# Altium PCB PCB1.PcbDoc (part 7 of 8)
Units mil, origin at the board's own origin, x right, y up, seen from the top; angles counter-clockwise.
Board outline 1968.5 x 1968.5 mil, 4 copper layers (Top Layer, Layer 1, Layer 2, Bottom Layer), stack 23.756 mil thick; 223 components, 143 nets, 652 pads, 329 vias.
Unrouted connection lines stored in the file: 15.
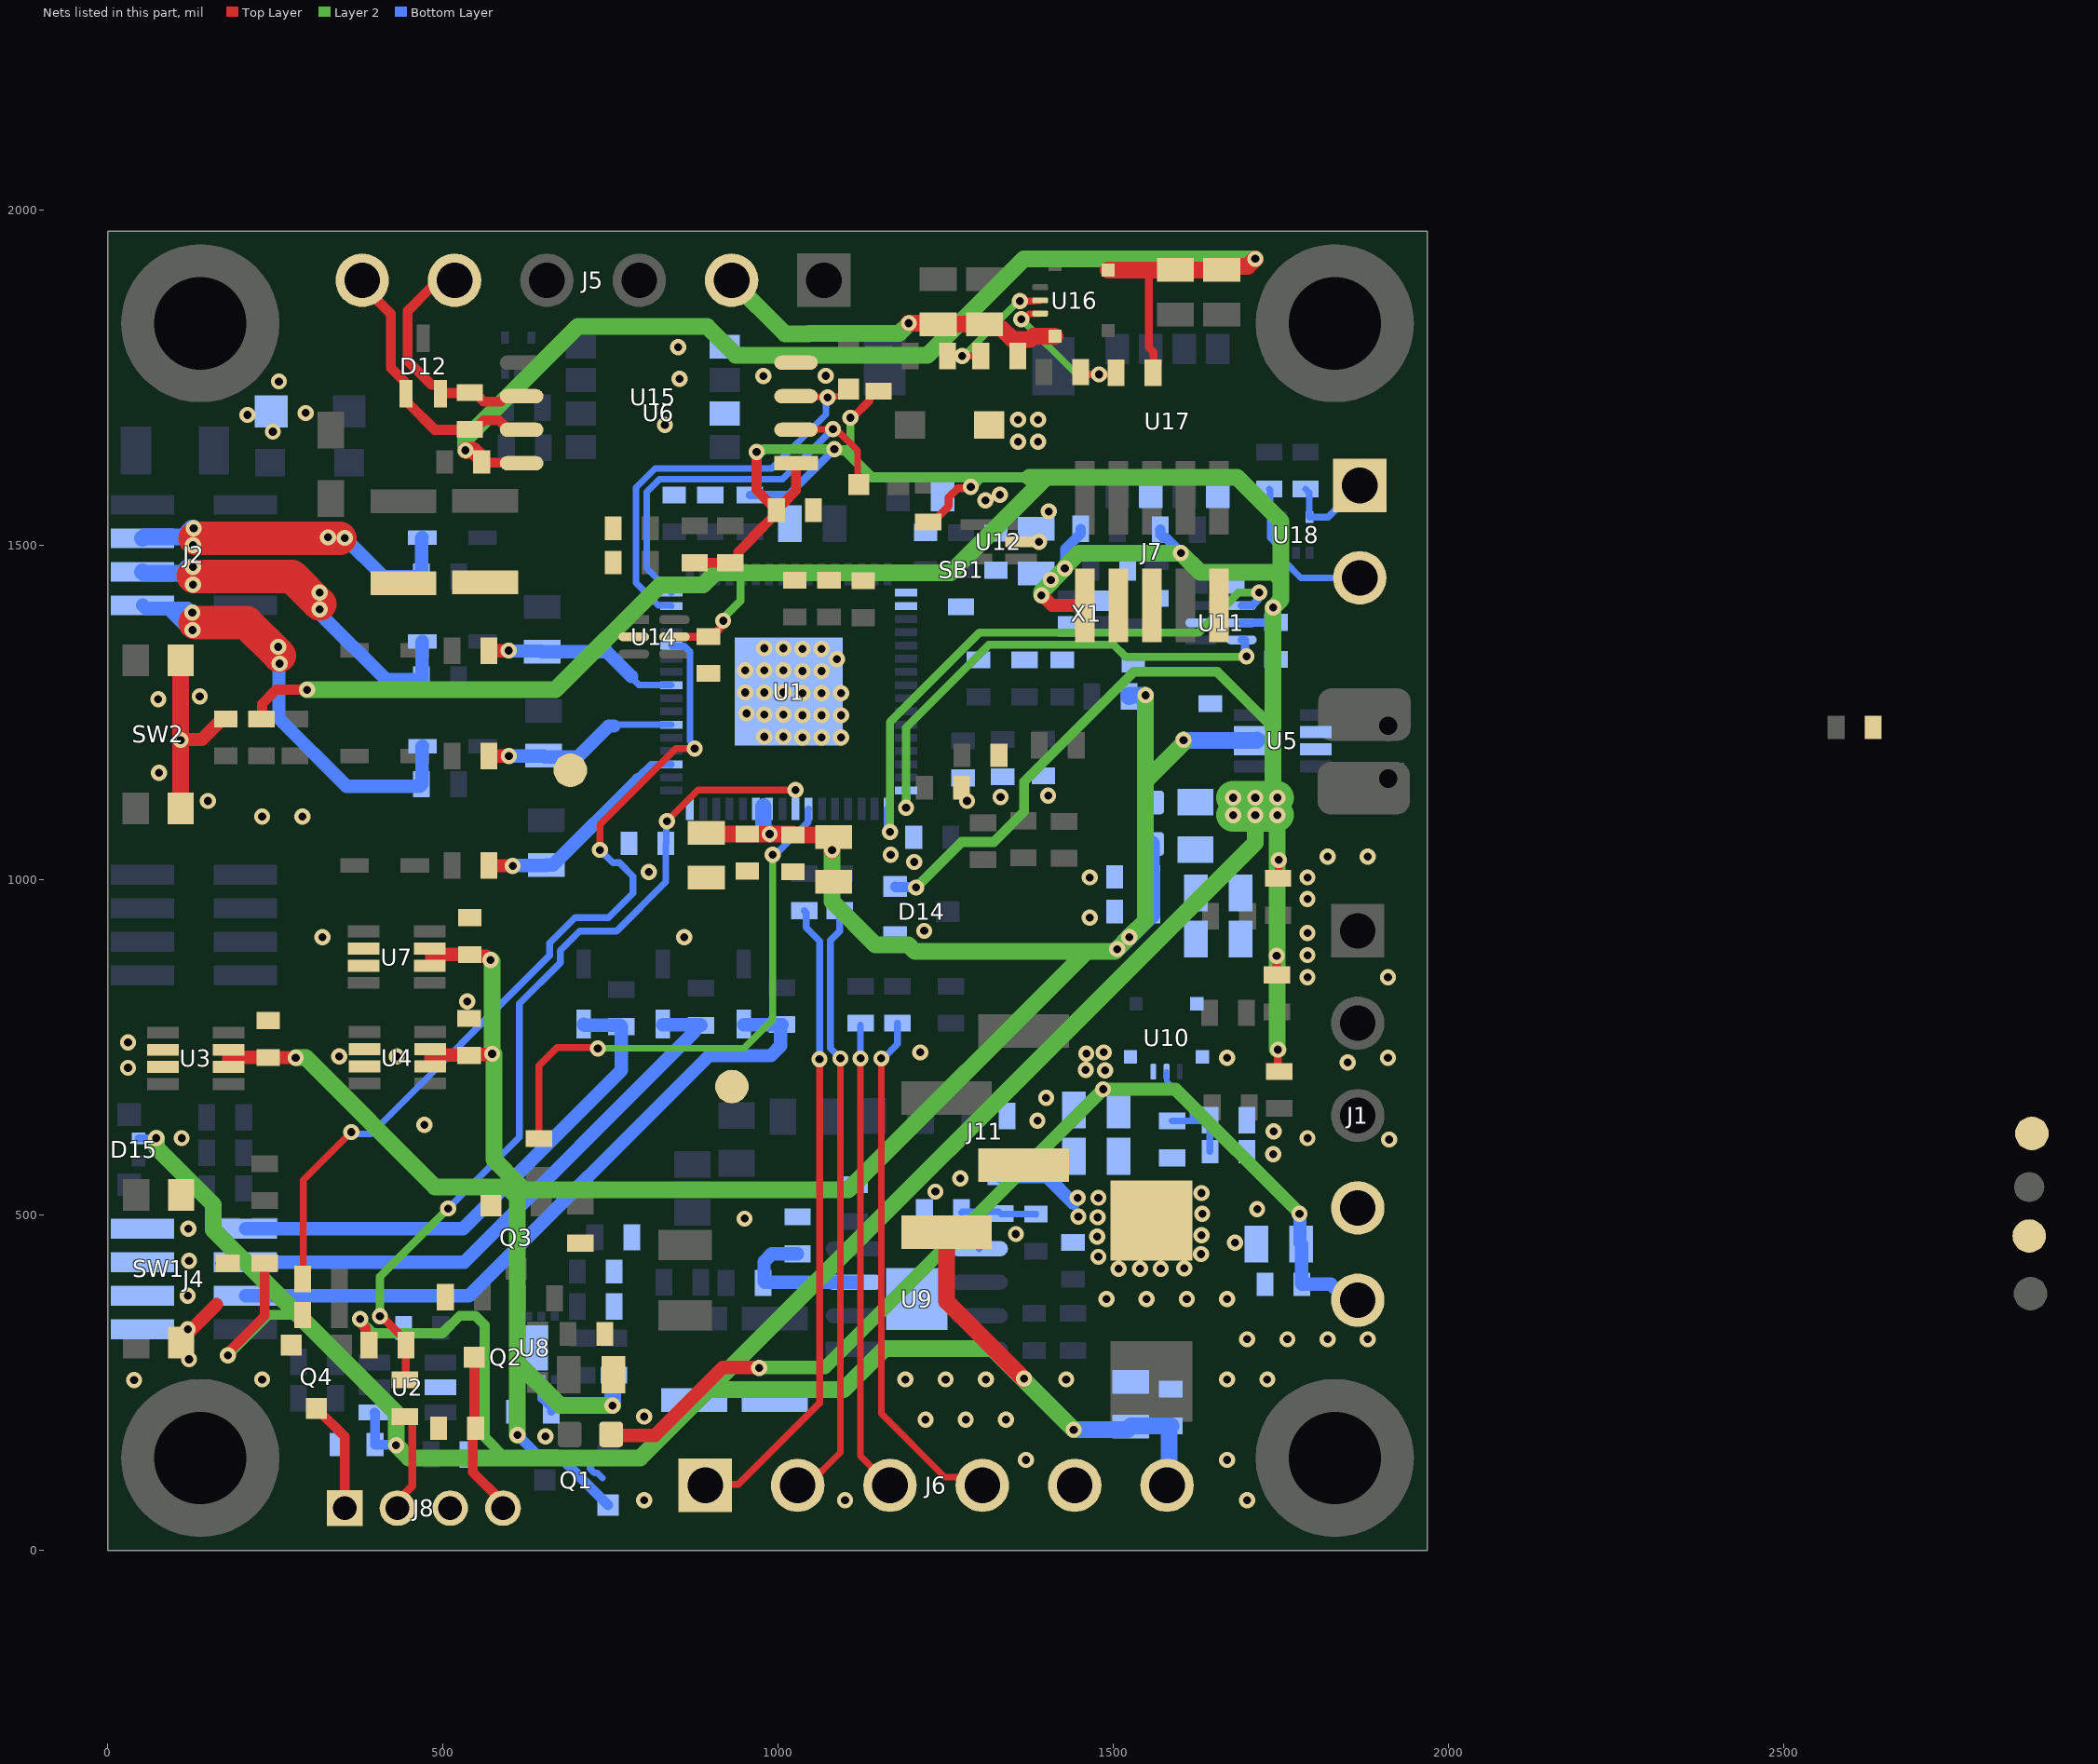
[diagram p4: the nets of this part, all layers, seen from the top]

## Part data (continued)
U10 U16: "3V to 17V input voltage, 3.3V, 3A output synchronous buck module in QFN package 7-QFN-FCMOD -40 to 125", Manufacturer="Texas Instruments", Manufacturer Lifecycle Status=ACTIVE, Package=None, Supplier Part Number=296-TPSM863253RDXRCT-ND, Category="Integrated Circuits (ICs)", Check_prices=https://www.snapeda.com/parts/TPSM863253RDXR/Texas+Instruments/view-part/?ref=eda, ComponentLink1Description=https://octopart.com:443/opatz8j6/c1?t=jS2VDNp59x-r3M4UnJwIkxDyXkbjHNSAoP2Fns5-Wk80kLlb-mQ5gVuk8zyi84j77RuBrZF-262aE3noOfDKcDGPEWkV9DoDQewFCLFFRyInceCxvVyAfhTYCYIywjkPWDqBy3YcbHQILjtWA_Eaj3WAHosXV5eHD7vpZYJjVrSO88bXdsuSYdlpSx9vUfFmQgFuFA-HMfKLGSBXL49TLOzJ5T2tngLQpQw-KF5iF-olhgVCegbBT0_kXe8-zNmOJ90ZL3AMoFtxFgWXTiA3kg8TbPVDzmO9NJcakYYdjuReFGLrhU-Lh8uurvImosMTR0LFVg6PaXdiPOKNUC1j5THOrz5of0wHKRbirvbX2rJGgWFTmZxbk0I20_VZT7Zu5rI_wToFdFWt&src-supplier=Texas+Instruments, ComponentLink1URL=https://octopart.com:443/opatz8j6/c1?t=jS2VDNp59x-r3M4UnJwIkxDyXkbjHNSAoP2Fns5-Wk80kLlb-mQ5gVuk8zyi84j77RuBrZF-262aE3noOfDKcDGPEWkV9DoDQewFCLFFRyInceCxvVyAfhTYCYIywjkPWDqBy3YcbHQILjtWA_Eaj3WAHosXV5eHD7vpZYJjVrSO88bXdsuSYdlpSx9vUfFmQgFuFA-HMfKLGSBXL49TLOzJ5T2tngLQpQw-KF5iF-olhgVCegbBT0_kXe8-zNmOJ90ZL3AMoFtxFgWXTiA3kg8TbPVDzmO9NJcakYYdjuReFGLrhU-Lh8uurvImosMTR0LFVg6PaXdiPOKNUC1j5THOrz5of0wHKRbirvbX2rJGgWFTmZxbk0I20_VZT7Zu5rI_wToFdFWt&src-supplier=Texas+Instruments, ComponentLink2Description=https://datasheet.octopart.com:443/TPSM863253RDXR-Texas-Instruments-datasheet-184174687.pdf?src-supplier=LCSC, ComponentLink2URL=https://datasheet.octopart.com:443/TPSM863253RDXR-Texas-Instruments-datasheet-184174687.pdf?src-supplier=LCSC, ComponentLink3Description=http://sigma.octopart.com:80/reach_statement/Texas-Instruments-company-64.pdf?src-supplier=Compliance+Statements, ComponentLink3URL=http://sigma.octopart.com:80/reach_statement/Texas-Instruments-company-64.pdf?src-supplier=Compliance+Statements, ComponentLink4Description=http://sigma.octopart.com:80/conflict_mineral_statement/Texas-Instruments-company-63.pdf?src-supplier=Compliance+Statements, ComponentLink4URL=http://sigma.octopart.com:80/conflict_mineral_statement/Texas-Instruments-company-63.pdf?src-supplier=Compliance+Statements, Height=0m, Length=4mm, Lifecycle Status=Production, Manufacturer Part Number=TPSM863253RDXR, MF="Texas Instruments", MP=TPSM863253RDXR, Pins=7, Pricing="1=2,63, 10=1,96, 25=1,7924, 100=1,6078, 250=1,51976, 500=1,46668, 1000=1,42301 (USD)", RoHS=Compliant, SnapEDA_Link=https://www.snapeda.com/parts/TPSM863253RDXR/Texas+Instruments/view-part/?ref=snap, Stock=3257, Supplier=DigiKey, Thickness=2mm, Width=3.3mm
U11 U14: library part CMP-0859-00447-5, "IC INVERT SCHMITT 2CH 2IN SC70-6", Case/Package=SC, High Level Output Current=-32mA, Low Level Output Current=32mA, Max Operating Temperature=85°C, Max Supply Voltage=5.5V, Min Operating Temperature=-40°C, Min Supply Voltage=1.65V, Package Quantity=3000, Quiescent Current=10uA, Contact Plating=Gold, Height=0.9mm, Input Type="SCHMITT TRIGGER", Lead Free="Lead Free", Length=2mm, Logic Function=Buffer, Max Output Current=32mA, Mount="Surface Mount", Number of Bits=2, Number of Circuits=2, Number of Elements=2, Number of Gates=2, Number of Inputs=1, Number of Pins=6, Output Current=32mA, Packaging="Tape and Reel", Propagation Delay=9.5ns, Radiation Hardening=No, REACH SVHC="No SVHC", RoHS Compliant=Yes, Schmitt Trigger Input=Yes, Series=74LVC, Technology=CMOS, Termination=SMD/SMT, Turn-On Delay Time=4.3ns, Width=1.25mm
U12: "Dual Transil array for ESD protection", Manufacturer=STMICROELECTRONICS, ComponentLink1Description=STM_ESD_ESDALC6V1W5.pdf, ComponentLink1URL=http://tunmcdsvn.tun.st.com/Component_Datasheet_Library/Trunk/Diodes/STM_ESD_ESDALC6V1W5, ECCN_EU=NEC, ECCN_US=EAR99, Initial_Board_Reference=MB1262, Internal_Part_Number=MCD-00136, Manufacturer_Part_Number=ESDALC6V1W5, Part_Type=Diode, Provided_By=Subcon, Status=Released
U13 U18: library part CMP-04985-000005-1, "TVS DIODE 5.5V 12.4V SOT5", Ambient Temperature Range High=+125°C, Ambient Temperature Range Low=-40°C, Breakdown Voltage=6.5V, Clamping Voltage=9.7V, Manufacturer="Texas Instruments", Package=DRL0005A, Peak Pulse Current=5.5A, Peak Pulse Power=85W, Reverse Standoff Voltage=5.5V, Temperature="-40°C to +125°C", Automotive=No, Category=IC, ComponentLink2Description=Datasheet, ComponentLink2URL=http://www.ti.com/lit/ds/symlink/tpd2e2u06.pdf, Device Class L1="Circuit Protection", Device Class L2="ESD and Circuit Protection ICs", Device Class L3=unset, Digikey Description="TVS DIODE 5.5V 12.4V SOT5", Direction=Unidirectional, Footprint Url=http://www.ti.com/lit/ds/symlink/sn74ahct1g08.pdf, Height=0.6mm, Interface=USB,Ethernet,LVDS,Other, Ipc Land Pattern Name=SOTFL50P160X55-6, Lead Free=Yes, Manufacturer Part Number=TPD2E2U06DRLR, Mouser Description="ESD Suppressors Dual-Ch High-Speed ESD Protection", Number of Channels=2, Octopart=https://octopart.com/tpd2e2u06drlr-texas+instruments-47095345, RoHS=TRUE, Standoff Height=0mm, Temperature Range High=+125°C, Temperature Range Low=-40°C
U15 U17: library part CMP-2000-06453-1, "Optocoupler, Phototransistor Output, Dual Channel, 4000 VRMS, -55 to 100 degC, 8-Pin SOIC, RoHS, Tape and Reel", Current - DC Forward (If) (Max)=30mA, Current - Output / Channel=-, Current Transfer Ratio (Max)=200%@10mA, Current Transfer Ratio (Min)=100%@10mA, Manufacturer=Vishay, Operating Temperature=-55°C~100°C, Package / Case="8-SOIC(0.154\",3.90mmWidth)", Package Description="8-Pin Small Outline Integrated Circuit, Body 5.84 x 3.91 mm, Pitch 1.27 mm", Package Reference=SOIC-8, Standard Package=1, Supplier Device Package=8-SOIC, Voltage - Forward (Vf) (Typ)=1.2V, Voltage - Isolation=4000Vrms, Voltage - Output (Max)=70V, Catalog Drawings=OptocouplerCircuit, Category=Isolators, Datasheet URL=http://www.vishay.com/docs/83647/ild205t.pdf, Datasheet Version="Rev. 2.1, 10/2015", EDA / CAD Models=DownloadfromAcceleratedDesigns, Family=Optoisolators-Transistor,PhotovoltaicOutput, Input Type=DC, Manufacturer URL=http://www.vishay.com/, Mounting Technology=SurfaceMount, Mounting Type=SurfaceMount, Number of Channels=2, Online Catalog=ILD205T,206T,207T,211T,213T,217TSeries, Other Names=751-1310-1ILD207TGICTILD207TGICT-ND, Output Type=Transistor, Packaging=CutTape(CT), Rise / Fall Time (Typ)=3µs,4.7µs, Series=-, Turn On / Turn Off Time (Typ)=6µs,5µs, Vce Saturation (Max)=400mV
X1: "Crystal, Quartz, 24 MHz, SMD, 2mm x 1.6mm x 0.5mm, 20 ppm, 8 pF, 10 ppm, ABM11W", ESR (Equivalent Series Resistance)=100Ω, Frequency=24MHz, Frequency Stability=20ppm, Frequency Tolerance=0.001%, Load Capacitance=8pF, Manufacturer=Abracon, Max Operating Temperature=85°C, Min Operating Temperature=-40°C, Package="SMD-4 Abracon LLC", Supplier Part Number=535-13835-1-ND, Category=Crystals, Check_prices=https://www.snapeda.com/parts/ABM11W-24.0000MHZ-8-D1X-T3/Abracon/view-part/?ref=eda, China RoHS=Compliant, ComponentLink1Description=https://datasheet.octopart.com:443/ABM11W-24.0000MHZ-8-D1X-T3-Abracon-datasheet-154833168.pdf?src-supplier=IHS, ComponentLink1URL=https://datasheet.octopart.com:443/ABM11W-24.0000MHZ-8-D1X-T3-Abracon-datasheet-154833168.pdf?src-supplier=IHS, ComponentLink2Description=https://datasheet.octopart.com:443/ABM11W-24.0000MHZ-8-D1X-T3-Abracon-datasheet-102760955.pdf?src-supplier=Upverter, ComponentLink2URL=https://datasheet.octopart.com:443/ABM11W-24.0000MHZ-8-D1X-T3-Abracon-datasheet-102760955.pdf?src-supplier=Upverter, ComponentLink3Description=https://datasheet.octopart.com:443/ABM11W-24.0000MHZ-8-D1X-T3-Abracon-datasheet-112015802.pdf?src-supplier=Master+Electronics, ComponentLink3URL=https://datasheet.octopart.com:443/ABM11W-24.0000MHZ-8-D1X-T3-Abracon-datasheet-112015802.pdf?src-supplier=Master+Electronics, ComponentLink4Description=https://datasheet.octopart.com:443/ABM11W-24.0000MHZ-8-D1X-T3-Abracon-datasheet-182204996.pdf?src-supplier=Master+Electronics, ComponentLink4URL=https://datasheet.octopart.com:443/ABM11W-24.0000MHZ-8-D1X-T3-Abracon-datasheet-182204996.pdf?src-supplier=Master+Electronics, ComponentLink5Description=https://sigma.octopart.com:443/141159858/technical_drawing/Abracon-ABM11W-24.0000MHZ-8-D1X-T3.pdf?src-supplier=Abracon+SCT, ComponentLink5URL=https://sigma.octopart.com:443/141159858/technical_drawing/Abracon-ABM11W-24.0000MHZ-8-D1X-T3.pdf?src-supplier=Abracon+SCT, ComponentLink6Description=http://sigma.octopart.com:80/conflict_mineral_statement/Abracon-company-27.pdf?src-supplier=Compliance+Statements, ComponentLink6URL=http://sigma.octopart.com:80/conflict_mineral_statement/Abracon-company-27.pdf?src-supplier=Compliance+Statements, ESR=30Ω, Height=500µm, Length=2mm, Lifecycle Status=Production, Manufacturer Part Number=ABM11W-24.0000MHZ-8-D1X-T3, MF="Abracon LLC", Mounting Technology="Surface Mount", MP=ABM11W-24.0000MHZ-8-D1X-T3, Pricing="1=0,38, 10=0,334, 25=0,3156, 50=0,3024, 100=0,29, 250=0,27424, 500=0,26288, 1000=0,25201 (USD)", REACH SVHC=Yes, RoHS=Compliant, SnapEDA_Link=https://www.snapeda.com/parts/ABM11W-24.0000MHZ-8-D1X-T3/Abracon/view-part/?ref=snap, Stock=2752, Supplier=DigiKey, Tolerance=0.001%, Width=1.6mm

## Free pads (board coordinates)
  round 236.22 hole 137.8: 2(137.8,137.8) 2(137.8,1830.71) 2(1830.71,137.8) 2(1830.71,1830.71)
  rrect50% 137.8x78.74 smd: 3(1874,1137) 3(1875,1247)

## Via types
v1: diameter 24, hole 12, Top Layer to Bottom Layer, tented both sides, 329 vias

## Nets (pads, with @x,y where several pads share a name; then routed paths per layer and width w, separated by ;. In a path a pad name is that pad's centre, name@x,y a point inside that pad or via, vN(x,y) a via of type N, cw(c..) or ccw(c..) an arc to the next point about the centre after c; other vN are vias at no path point)
3V3: C23.2 C33.1 C34.1 C47.2 C49.1 C50.1 C60.1 C64.1 D14.2 D15.2 J6.6 J7.1 J11.4 L3.1 R1.2 R21.1 R24.1 R37.2 R38.2 R44.2 R45.2 R46.2 R69.2 R71.1 R72.2 R73.2 R74.2 R75.2 SB1.1 U1.1 U1.2 U2.4 U6.1 U11.5 U14.5 | length 9804
  Top Layer w12: U14.5@845.32,1363 849.32,1363 849.55,1363.23 895.67,1363.23 C64.1@896,1363.56 900.92,1363.56 915.7,1378.34 915.7,1384.7 v1(918,1387) ; v1(1108,1690) 1110.99,1690 1136.31,1715.32 1136.31,1722.84 1142.91,1729.44 R24.1@1150,1729.44 ; R21.1@1224,1534.44 1231.09,1534.44 1254.66,1558.01 1254.66,1570.96 1268.16,1584.47 1285.23,1584.47 v1(1287.52,1586.76) ; v1(1744,887) 1744,859 R45.2@1744.44,858.56 ; v1(1746,747) 1746,716.56 R44.2@1748,714.56 ; R46.2@1746,1002.56 1747,1003.56 v1(1747,1030)
  Top Layer w15: v1(179,291) 181,293 181,297 234,350 R37.2@234,428.44 ; R38.2@229,1240.56 230,1241.56 230,1263 251,1284 v1(297,1284) ; v1(376.16,345) 377.88,343.28 377.88,338.12 384.34,331.66 384.34,311.1 R69.2@389.44,306 ; R75.2@875.46,1473.4 R74.2@928.46,1473.4 935.54,1473.4 940.64,1478.5 940.64,1489.33 961.64,1510.33 961.64,1511.28 997.44,1547.08 C23.2@997.44,1552 ; v1(968,1639) 968,1582 C23.2@991.24,1558.76 ; C23.2@997.44,1556.92 1002.54,1562.02 1007.46,1562.02 1026.56,1581.12 1026.56,1618.83 1026.74,1619.01 U6.1@1026.74,1622
  Top Layer w20: v1(1393,1425) 1394.08,1425 1409.2,1409.88 J7.1@1458,1409.88
  Top Layer w25: J11.4@1251.5,475 1251.5,371.5 v1(1367,256)
  Layer 2 w12: v1(918,1387) 918,1390.25 924,1396.25 924,1396.94 944,1416.94 944,1458.37 ; 1106.47,1634.47 1108,1636 v1(1108,1690) ; v1(1287.52,1586.76) 1290.77,1586.76 1305.01,1601 1310,1601
  Layer 2 w15: v1(179,291) 239.5,351.5 283.5,351.5 ; v1(376.16,345) 376.16,343.03 395.27,323.92 416.39,323.92 416.48,324 498.94,324 524.94,350 548.21,350 562,336.21 562,169 593,138 ; v1(968,1639) 969.72,1640.72 976.09,1640.72 978.36,1643 v1(1084,1643) 1085.72,1641.28 1099.66,1641.28 1106.47,1634.47 1139.94,1601 1310,1601 1375,1601 ; v1(1206,989) 1274,1057 1322,1057 1367,1102 1367,1147 1531,1311 1655,1311 1659.99,1306.01 1738.77,1227.23 1738.77,1214
  Layer 2 w25: v1(72,615) 72,601 157,516 157,478 283.5,351.5 430,205 v1(430,157) 449,138 593,138 794.38,138 1712,1055.62 ; v1(297,1284) 668,1284 824.5,1440.5 888.23,1440.5 906.1,1458.37 944,1458.37 1257.51,1458.37 1400.13,1601 ; 899.99,240.08 1098.08,240.08 1159,301 1320,301 v1(1441,180) ; 1375,1601 1400.13,1601 ; v1(1393,1425) 1393,1430.27 v1(1427.92,1465.2) ; v1@1428.32,1467.68 1448.64,1488 v1(1601,1488) 1630,1459 1695.4,1459 1695.75,1459.35 1740.15,1459.35 1750.5,1449 ; 1712,1058.12 v1(1712,1097) ; 1738.77,1214 1738.77,1129.23 v1(1745,1123) v1(1745,1097) 1745,748 v1(1746,747) ; 1738.77,1227.23 v1(1738.76,1406.65) ; v1(1738.76,1406.65) 1750.5,1418.37 1750.5,1449 ; 1400.13,1601 1685,1601 1750.5,1535.5 1750.5,1449
  Layer 2 w50: v1(1679,1097) v1(1712,1097) v1(1745,1097) ; v1(1679,1123) v1(1712,1123) v1(1745,1123)
  Bottom Layer w12: D15.2@45.62,614.73 45.76,614.87 71.87,614.87 v1(72,615) ; R1.2@958,1574.56 1015.56,1574.56 v1(1084,1643) ; U11.5@1691.32,1384 1710.95,1384 1711.18,1384.23 1742.67,1384.23 1740.88,1386.03 1740.88,1404.53 v1(1738.76,1406.65)
  Bottom Layer w15: U2.4@397.79,205.6 398.56,204.83 C47.2@398.56,158 399.06,157.5 429.5,157.5 v1(430,157) ; D14.2@1174.63,990.4 1175.33,989.7 1205.3,989.7 v1(1206,989) ; v1(1427.92,1465.2) 1428.32,1465.59 1428.32,1493.79 1451.44,1516.91 R73.2@1451.44,1524 ; R72.2@1570.44,1523 1570.44,1515.91 1575.54,1510.81 1578.95,1510.81 1601,1488.77 v1@1601,1488.6
  Bottom Layer w25: v1(1441,180) 1521.46,180 1526.81,185.34 1585.9,185.34 C34.1@1586,185.44 1583.29,185.44 1583.19,185.34 1583.19,99.81 J6.6@1580.39,97
  other v1: 1407,1448
3V3_A: C9.1 C22.2 C25.2 C27.2 C30.2 C31.2 C45.2 C52.2 C53.1 C54.2 C55.2 L3.2 Q1.2 R31.1 R55.1 U1.26 U1.27 U3.6 U3.7 U4.6 U4.7 U5.6 U5.7 U7.6 U7.7 U8.8 | length 4505.1
  Top Layer w20: U3.6@180.21,725 180.21,735.44 ; U3.7@180.21,740 180.21,735.44 ; v1(280,735) 279.78,735.22 239.22,735.22 C30.2@239,735.44 180.21,735.44 ; U4.6@482,728.56 482,739 538,739 539,738 541,740 572.47,740 v1(573.24,740.76) ; U7.6@483,878.56 483,889 C25.2@540,889 ; C25.2@540,888.88 542.6,886.28 564.63,886.28 569.92,881 v1(571,881)
  Top Layer w25: C53.1@893,1070.46 894.81,1068.66 953.9,1068.66 954.1,1068.46 987.33,1068.46 C52.2@1022,1068.46 ; C52.2@1023.09,1067.46 1080,1067.46 C9.1@1083,1064.46 1080.5,1061.96 v1(1080.5,1044.66)
  Layer 2 w25: v1(280,735) 295.13,735 488.13,542 596.36,542 606.68,531.68 611,527.36 611,280 ; v1(571,881) 573.24,878.76 v1(573.24,740.76) ; v1@576,740.76 576,583 613,546 ; v1(611,172) 611,280 ; 613,538 1105,538 1460.85,893.85 ; v1(753,216) 675,216 611,280 ; v1(1080.5,1044.66) 1080.5,968.35 1145.35,903.5 1194.19,903.5 1203.85,893.85 1460.85,893.85 ; v1(1548.37,1275.86) 1548.37,1148 ; v1(1605,1209) 1605,1204.63 1548.37,1148 ; 1460.85,893.85 1502.85,893.85 v1(1506,897) v1(1524,915) 1548.37,939.37 1548.37,1148
  Bottom Layer w12: C45.2@606.44,207 607.38,207.94 U8.8@607.38,253.87
  Bottom Layer w15: C45.2@606.44,207 609.28,204.16 609.28,173.72 640.5,142.5 671.34,142.5 Q1.2@746.24,67.6
  Bottom Layer w25: v1(753,216) 753,261.34 753.1,261.44 R55.1@755,261.44 ; 978,1110 978,1078.09 v1(987.33,1068.76) ; v1(1506,897) 1506.48,897 1557.56,948.08 C55.2@1557.56,953 C22.2@1557.56,1005 1557.56,1009.92 1557,1010.48 L3.2@1557,1054.09 ; R31.1@1523.56,1274 1523.56,1275.76 1523.66,1275.86 v1(1548.37,1275.86) ; v1(1605,1209) 1605.46,1208.54 1644.9,1208.54 C31.2@1645,1208.44 1714.44,1208.44 1715,1209
3V3_TPSM: C16.2 C17.2 R71.2 TP1.1 U10.3 U10.7
5V: C12.2 C14.2 C15.2 C32.1 C35.1 J1.5 L2.2 L4.1 R14.2 R19.2 U10.1 | length 1644.3
  Top Layer w20: L4.1@750.91,171.62 816.22,171.62 917.6,273 971,273 v1(971.75,272.25)
  Layer 2 w20: v1(971.75,272.25) 972.51,273 1070,273 v1(1485,688) 1593.08,688 1778,503.08 v1(1778,502)
  Bottom Layer w20: R14.2@1332,557.56 1400.94,557.56 v1@1440.75,517.75 ; v1(1778,502) 1778.77,501.23 1778.77,458.7 C35.1@1780.46,457 1781.01,456.45 1781.01,397.55 C32.1@1781.56,397 1825.04,397 1848.84,373.2 J1.5@1865,373.2
  other v1: 1508,420 1540,420 1571,420 1606,421 1478,438 1631,442 1476,468 1632,470 1477,497 1448,498 1633,502 1447,526 1478,526 1632,533 1488,716 1459,717 1460,741 1486,743
5V_EXT: C65.2 C68.2 C69.2 R79.2 TP5.1 U6.8 U16.3 | length 1818.3
  Top Layer w12: U6.8@616.26,1623 U6.8@617.26,1622 ; 1553.25,1910.28 1553.25,1794.75 1560,1788 1560,1757.44 R79.2@1559.56,1757
  Top Layer w15: C65.2@558.56,1623 U6.8@616.26,1623
  Top Layer w25: v1(533.54,1641.34) 545.14,1641.34 557.56,1628.92 C65.2@557.56,1624 ; U16.3@1492.57,1910.28 1553.25,1910.28 1593,1910.28 1593.19,1910.46 C68.2@1662,1910.46 1667.22,1915.68 1700.68,1915.68 v1(1712,1927)
  Layer 2 w25: v1(533.54,1641.34) 533.54,1658.54 701,1826 894,1826 937,1783 1223,1783 1367,1927 v1(1712,1927)
5V_FAN: C58.2 J8.4 Q2.3 | length 246
  Top Layer w15: Q2.3@546.76,288 546.76,183.8 C58.2@548.56,182 544.56,178 544.56,116.5 589.48,71.58 J8.4@589.48,63
12V_EXT: C66.2 C67.2 J5.2 R54.2 U16.1 | length 529.3
  Top Layer w25: v1(1195,1831) 1237.54,1831 C66.2@1239,1829.54 C67.2@1308,1829.54 ; C67.2@1313,1829.54 1318.22,1824.32 1332.06,1824.32 1349.88,1806.5 1375.63,1806.5 1380.49,1811.36 U16.1@1413.34,1811.36
  Layer 2 w25: J5.2@930.59,1895 1010.59,1815 1045.03,1815 1045.53,1815.5 1180.5,1815.5 v1@1195,1830
BOOT1: C3.2 R8.2 U1.41 | length 294.8
  Top Layer w20: R8.2@568.56,1342 568.83,1342.28 597.77,1342.28 v1(598.05,1342.55)
  Bottom Layer w10: 781.12,1303.88 781.12,1302.27 792.34,1291.04 U1.41@840.8,1291.04
  Bottom Layer w20: v1(598.05,1342.55) 598.81,1341.79 646.75,1341.79 C3.2@648,1340.54 744.46,1340.54 781.12,1303.88
BOOT2: C4.2 R7.2 U1.38 | length 283.3
  Top Layer w20: R7.2@568.56,1185 568.7,1185.14 598.12,1185.14 v1(598.25,1185.28)
  Bottom Layer w10: 763.97,1231.99 U1.38@840.8,1231.99
  Bottom Layer w20: v1(598.25,1185.28) 598.38,1185.41 649.87,1185.41 C4.2@650,1185.54 652,1183.54 701.04,1183.54 747.5,1230 754.73,1230
BOOT3: C5.2 R6.2 U1.35 | length 334.2
  Top Layer w20: R6.2@568.56,1022 569.06,1021.5 603.5,1021.5 v1(604,1021)
  Bottom Layer w10: 791.21,1153.79 810.04,1172.62 840.49,1172.62 U1.35@840.8,1172.93
  Bottom Layer w20: v1(604,1021) 604.77,1021.77 653.23,1021.77 C5.2@654,1022.54 663.84,1022.54 791.34,1150.03
BRAKE_ANALOG: U1.17 U11.4 | length 869.7
  Layer 2 w12: v1(1167,1072) 1167,1236 1300.43,1369.43 1627.56,1369.43 1686.97,1428.85 v1(1717.84,1428.85)
  Bottom Layer w12: U1.17@1163.64,1106 1163.73,1105.91 1163.73,1078.51 1167,1075.25 v1(1167,1072) ; U11.4@1691.32,1409.59 1707.29,1409.59 1715.55,1417.85 1715.55,1426.55 v1(1717.84,1428.85)
BRAKE_ANALOG_IN: J9.1 R83.1 U18.5 | length 139.1
  Bottom Layer w10: R83.1@1787,1583.44 1792.68,1577.76 U18.5@1792.68,1541.57 1820.78,1541.57 J9.1@1868,1588.8
CAN_N: D12.2 J5.5 R22.1 U6.6 | length 368.8
  Top Layer w15: D12.2@496.69,1726.23 497.06,1726.6 548.04,1726.6 560.65,1714 585.65,1714 593.65,1722 U6.6@617.26,1722 ; D12.2@498.45,1726.23 498.45,1734.13 493.76,1738.81 482.94,1738.81 447.17,1774.58 447.17,1849.17 480.62,1882.62 504.82,1882.62 J5.5@517.2,1895
CAN_P: D12.1 J5.6 R22.2 U6.7 | length 403
  Top Layer w15: J5.6@379.41,1895 379.41,1887.7 422.17,1844.94 422.17,1764.22 442.58,1743.81 442.58,1727.99 D12.1@444.93,1725.64 ; D12.1@447.27,1720.59 447.27,1712.48 487.74,1672 R22.2@540,1672 ; R22.2@540,1672.44 547.09,1672.44 560.69,1686.04 583.41,1686.04 594.16,1675.3 594.16,1674.93 597.09,1672 U6.7@617.26,1672
CAN_RX: D13.1 U1.47 U6.3 | length 648.4
  Top Layer w10: U6.3@1026.74,1722 1027.74,1721 1073,1721 v1(1074,1720) 1075.72,1721.72 1094.25,1721.72 D13.1@1105,1732.47
  Bottom Layer w10: U1.47@840.8,1409.15 839.9,1410.06 821.39,1410.06 788,1443.45 788,1585.86 816.3,1614.16 990.64,1614.16 1071.32,1694.84 1071.32,1717.32 v1(1074,1720)
CAN_TX: D11.1 U1.48 U6.2 | length 639.6
  Top Layer w10: U6.2@1026.74,1672 1027.21,1672.46 1081.47,1672.46 v1(1081.94,1672.93) 1084.61,1670.25 1089.28,1670.25 1118.75,1640.78 1118.75,1591.72 D11.1@1120.47,1590
  Bottom Layer w10: U1.48@840.8,1428.84 804,1465.64 804,1579.23 822.92,1598.16 923.24,1598.16 974.16,1598.16 1006.63,1598.16 1081.4,1672.93 v1(1081.94,1672.93)
EN_EXT: C70.2 R54.1 R80.2 U16.6 | length 199.8
  Top Layer w10: R80.2@1252.56,1782 v1(1274.72,1782) R54.1@1302.44,1782 ; v1(1361,1864) 1382.72,1864 1383.05,1864.33 U16.6@1390.53,1864.33
  Layer 2 w10: v1(1274.72,1782) 1276.86,1782 1358.86,1864 v1(1361,1864)
EN_LM: R15.1 R17.2 U9.3 | length 219.7
  Bottom Layer w20: R17.2@1029,442.44 990.72,442.44 979,430.73 979,401.16 980.16,400 U9.3@1113.85,400
EN_TPSM: C18.2 R19.1 R20.2 U10.6 | length 195.6
  Bottom Layer w8: U10.6@1579.67,714.2 1579.67,700.33 1586.5,693.5
  Bottom Layer w10: 1586.5,693.5 1619,661 1619,644.56 1623,640.56 ; R19.1@1588,640.56 1619,640.56 1623,640.56 ; C18.2@1644.44,595 R20.2@1644.44,642 1643,640.56 1623,640.56
ENCODER_CS: J6.1 R52.1 | length 965.7
  Top Layer w10: J6.1@891.41,97 892.82,98.41 940.41,98.41 1062,220 1062,732.47 v1(1061.74,732.74)
  Bottom Layer w10: R52.1@1039,954.44 1042,951.44 1042,929 1062,909 1062,733 v1(1061.74,732.74)
ENCODER_MISO: J6.3 R53.2 | length 704.7
  Top Layer w10: v1(1123,734) 1123,141 J6.3@1167,97
  Bottom Layer w10: v1(1123,734) R53.2@1123,783.44
ENCODER_MOSI: J6.2 R51.2 | length 903.6
  Top Layer w10: J6.2@1029.2,97 1044,97 1093,146 v1(1093,734)
  Bottom Layer w10: R51.2@1092,954.44 1092,924 1078,910 1078,749 v1@1092.31,734.69
ENCODER_SCK: J6.4 R50.2 | length 789.1
  Top Layer w10: v1(1154,734) 1154,204 1248.6,109.4 1292.4,109.4 J6.4@1304.8,97
  Bottom Layer w10: v1(1154,734) 1156.74,734 1178,755.26 R50.2@1178,786.44
FAN_ON: R65.1 U1.23 | length 827.3
  Top Layer w10: R65.1@643,612.88 643,723.05 670.09,750.14 729.84,750.14 v1(731.04,748.94)
  Layer 2 w10: v1(731.04,748.94) 948.94,748.94 991.95,791.95 v1(991.95,1037.96)
  Bottom Layer w10: v1(991.95,1037.96) 994.63,1040.64 998.67,1040.64 1044.62,1086.59 1044.62,1105.1 U1.23@1045.53,1106
FAN_PWM: J8.1 Q4.3 | length 166.3
  Top Layer w15: Q4.3@311,211.76 353.26,169.5 J8.1@353.26,63
FAN_PWM_ON: R67.1 U1.44 | length 1329.2
  Top Layer w10: R67.1@291.47,402 291.47,552.47 332.96,593.96 v1(363,624) ; v1(734,1045) 734,1083 847.32,1196.32 v1(875.54,1196.32)
  Bottom Layer w10: v1(363,624) 365.68,621.32 392.68,621.32 659,887.64 659,906 697,944 747,944 783.5,980.5 783.5,1005.63 763.21,1025.92 753.11,1025.92 v1(734,1045) ; U1.44@840.8,1350.1 841.71,1349.19 860.22,1349.19 868.54,1340.87 868.54,1207.1 875.54,1200.1 v1(875.54,1196.32)
FAN_TACHO: C59.2 R69.1 R70.2 U1.24 | length 1273
  Top Layer w10: v1(834,1088) 880.32,1134.32 v1(1025.84,1134.32)
  Top Layer w12: v1(405.83,349.42) 408.23,349.42 444.56,313.09 R69.1@444.56,306 444.56,254.56 R70.2@443,254.56
  Layer 2 w12: v1(405.83,349.42) 405.83,408.33 v1(507.5,510)
  Bottom Layer w10: v1(507.5,510) 614,616.5 614,815.75 675,876.75 675,895 704,924 759,924 832.56,997.56 C59.2@832.56,1055 833.28,1055.72 833.28,1087.28 v1(834,1088)
FAN_TACHO_IN: J8.2 R70.1 | length 152.7
  Top Layer w12: J8.2@432,63 432,74.13 454,96.13 454,192.84 447.4,199.44 R70.1@443,199.44
FB: C13.1 R14.1 R18.2 U9.5 | length 170.1
  Bottom Layer w10: R18.2@1273.56,504 1275,505.44 1303.56,505.44 ; U9.5@1300.15,450 1300.15,502.03 1303.56,505.44 ; R14.1@1332,502.44 1329,505.44 1303.56,505.44 ; R14.1@1332.44,502.44 1332.88,502 1384.56,502 C13.1@1385,501.56
FB_EXT: R79.1 R81.2 U16.7 | length 240.3
  Top Layer w10: v1(1363,1837) 1366.79,1837 1374.43,1844.65 U16.7@1390.53,1844.65 ; R81.2@1451.56,1758 1451.56,1755 1452.09,1754.47 v1(1479.05,1754.47) ; v1@1477.75,1756.75 1480.03,1754.47 1501.91,1754.47 R79.1@1504.44,1757
  Layer 2 w10: v1(1363,1837) 1445.53,1754.47 v1(1479.05,1754.47)
GAS_ANALOG: U1.16 U11.6 | length 742.6
  Layer 2 w12: v1(1191,1108) 1191,1227.54 1314.46,1351 1500.81,1351 1518.81,1333 1698,1333 v1(1699,1334)
  Bottom Layer w12: v1(1191,1108) 1191.1,1108.1 1191.1,1133.47 U1.16@1191.2,1133.56 ; U11.6@1691.32,1358.41 1696.14,1358.41 1696.7,1357.85 1696.7,1336.3 v1(1699,1334)
GAS_ANALOG_IN: J9.2 R82.1 U18.3 | length 239.8
  Bottom Layer w10: R82.1@1733,1583.44 1734.16,1582.28 1734.16,1510.54 1752.41,1492.28 1752.41,1489.33 1754.22,1487.52 1754.22,1476.88 1780.11,1451 J9.2@1868,1451
GHS1: D1.2 J2.4 R3.2 | length 566.4
  Top Layer w50: v1@130,1510 v1@346.38,1510
  Bottom Layer w20: v1(328.5,1511.5) 329,1511 353,1511 v1(353.5,1510.5) 411,1453 R3.2@467.88,1453 467.88,1510.17 468.71,1511 D1.2@469.12,1511
  Bottom Layer w25: J2.4@51.73,1510 53.99,1512.26 112.36,1512.26 ; 112.36,1512.26 124.62,1500 v1(127,1500) 127,1524 v1(128,1525) 125.09,1525 112.36,1512.26
GHS2: D2.2 J2.6 R4.2 | length 617.7
  Top Layer w50: 127,1454 128,1453 274.71,1453 v1@316,1411.71
  Bottom Layer w20: v1(316,1429.06) v1(316,1404) 316.77,1403.23 316.77,1397.23 415,1299 R4.2@467.88,1299 468.5,1299.62 468.5,1355.38 D2.2@469.12,1356
  Bottom Layer w25: J2.6@51.73,1460 53.99,1457.74 110.26,1457.74 110.33,1457.67 ; 110.33,1457.67 119.77,1467.12 v1(126.82,1467.12) 127,1466.94 v1(127,1441) 110.33,1457.67
GHS3: D4.2 J2.8 R5.2 | length 712.2
  Top Layer w50: v1@130,1384 207,1384 256,1335
  Bottom Layer w20: J2.8@51.73,1410 56.49,1405.24 118.47,1405.24 124.71,1399 v1(125.8,1399) ; v1@255,1348 255,1241 356,1140 465.28,1140 467.88,1142.6 R5.2@467.88,1143 468.72,1143.84 468.72,1199.17 D4.2@469.55,1200
  Bottom Layer w25: J2.8@97.5,1401.5 v1(126,1373) 126,1398.79 v1(125.8,1399)
  other v1: 256,1323 254,1348
GLS1: D10.2 J4.5 R11.2 | length 1042.6
  Bottom Layer w20: J4.5@205.27,380 539,380 897,738 989,738 1003.84,752.84 1003.84,782.28 R11.2@1006,784.44 1005.84,784.28 949.16,784.28 D10.2@949,784.12
GLS2: D9.2 J4.3 R10.2 | length 887.6
  Bottom Layer w20: J4.3@205.27,430 531.56,430 875.31,773.76 875.31,780.84 877.91,783.44 R10.2@885,783.44 884.32,784.12 D9.2@828,784.12
GLS3: D8.2 J4.1 R9.2 | length 782
  Bottom Layer w20: J4.1@205.27,480 530,480 766,716 R9.2@766,781.44 764.16,783.28 710.83,783.28 710,784.11 D8.2@710,785.12
GND: C1.1 C2.1 C6.1 C7.1 C9.2 C10.1 C11.1 C14.1 C15.1 C16.1 C17.1 C18.1 C19.2 C20.1 C21.2 C22.1 C23.1 C24.1 C25.1 C26.1 C27.1 C28.1 C29.1 C30.1 C31.1 C32.2 C33.2 C34.2 C35.2 C36.1 C37.1 C38.1 C39.1 C40.2 C41.2 C42.1 C43.1 C44.1 C45.1 C46.1 C47.1 C48.1 C49.2 C50.2 C51.2 C52.1 C53.2 C54.1 C55.1 C56.2 C57.1 C58.1 C59.1 C60.2 C61.2 C62.2 C63.2 C64.2 C71.2 D3.2 D14.1 D20.2 J1.4 J4.2 J4.4 J4.6 J4.8 J6.5 J7.3 J7.5 J7.9 J8.3 J11.3 Q3.2 Q4.2 R2.1 R16.1 R17.1 R18.1 R20.1 R32.1 R36.1 R57.2 R60.2 R61.1 R66.2 R68.2 R78.2 SW1.A1 SW1.A2 SW2.A1 SW2.A2 TP2.1 TP4.1 U1.32 U1.65 U2.2 U3.2 U3.3 U4.2 U4.3 U5.2 U5.3 U6.4 U7.2 U7.3 U8.6 U8.9 U9.9 U10.4 U11.2 U12.2 U14.2 U15.5 U15.7 U17.5 U17.7 X1.2 X1.4 | length 486
  Top Layer w20: v1(108.46,1209) 109.23,1209.77 140.29,1209.77 171.08,1240.56 C41.2@176,1240.56 ; SW1.A2@109.12,309.76 109.12,313.7 162,366.58 ; SW1.A1@109.12,526.3 SW1.A1@109.12,530.24 ; C40.2@170.48,428.44 C40.2@179,428.44
  Top Layer w25: SW2.A2@108.46,1107.26 v1(108.46,1209) SW2.A1@108.46,1327.74
  Bottom Layer w10: 713,135 719.5,128.5 719.5,122.1 725.94,115.65 730.35,115.65 738,108
  Bottom Layer w12: U8.6@646.84,254.76 646.94,254.66 646.94,226.54 661.56,211.92 C45.1@661.56,207
  other v1: 800,75 1100,75 1700,75 1370,135 1670,135 653,170 1220,195 1280,195 1340,195 800,199.62 39,254 230,255 1190,255 1250,255 1310,255 1430,255 1670,255 1730,255 121,285 1700,315 1760,315 1820,315 1880,315 119,330 1490,375 1550,375 1610,375 1670,375 119,380 121,432 1682,459 1354.83,471.84 120,480 950,495 1715,509 1234.75,535.25 1272,555 1739,591 1912,613 110,615 1790,615 1739.58,625 472,635 1387,641 1400,675 30,720 1850,728 1670,735 1910,735 345,737 431,737 1212,743 30,758 536,819 1790,855 1910,855 1790,888 320,915 860,915 1790,921 1218,924.35 1465,944 1790,972 1465,1004 1790,1004 807,1012 1203,1027 1820,1035 1880,1035 1168,1038 230,1095 290,1095 149,1118 1282,1118 1332,1124 1403,1126 76,1160 1036.5,1213 1065,1213 1094,1213 979.5,1214 1008,1214 1036.5,1246 1065,1246 1094,1246 979.5,1247 1008,1247 952.75,1248.75 75,1270 137,1274 1036.5,1279 1065,1279 1094,1279 951,1280 979.5,1280 1008,1280 1036.5,1312 1065,1312 951,1313 979.5,1313 1008,1313 1087.74,1329.74 1036.5,1345 1065,1345 979.5,1346 1008,1346 1389.43,1504.72 1404.01,1550.15 1309.6,1566.45 1331,1575 1358,1654 1388,1654 246,1669 831,1679 1358,1687 1388,1687 208,1694 295,1697 255,1744 853,1748 978,1752 1071,1752.5 851,1795